# Altium PCB ePBR22_ACC_Charging.PcbDoc (part 1 of 3)
Units mil, origin at the board's own origin, x right, y up, seen from the top; angles counter-clockwise.
Board outline 10580 x 3865 mil, 2 copper layers (Top Layer, Bottom Layer); 147 components, 103 nets, 520 pads, 142 vias.
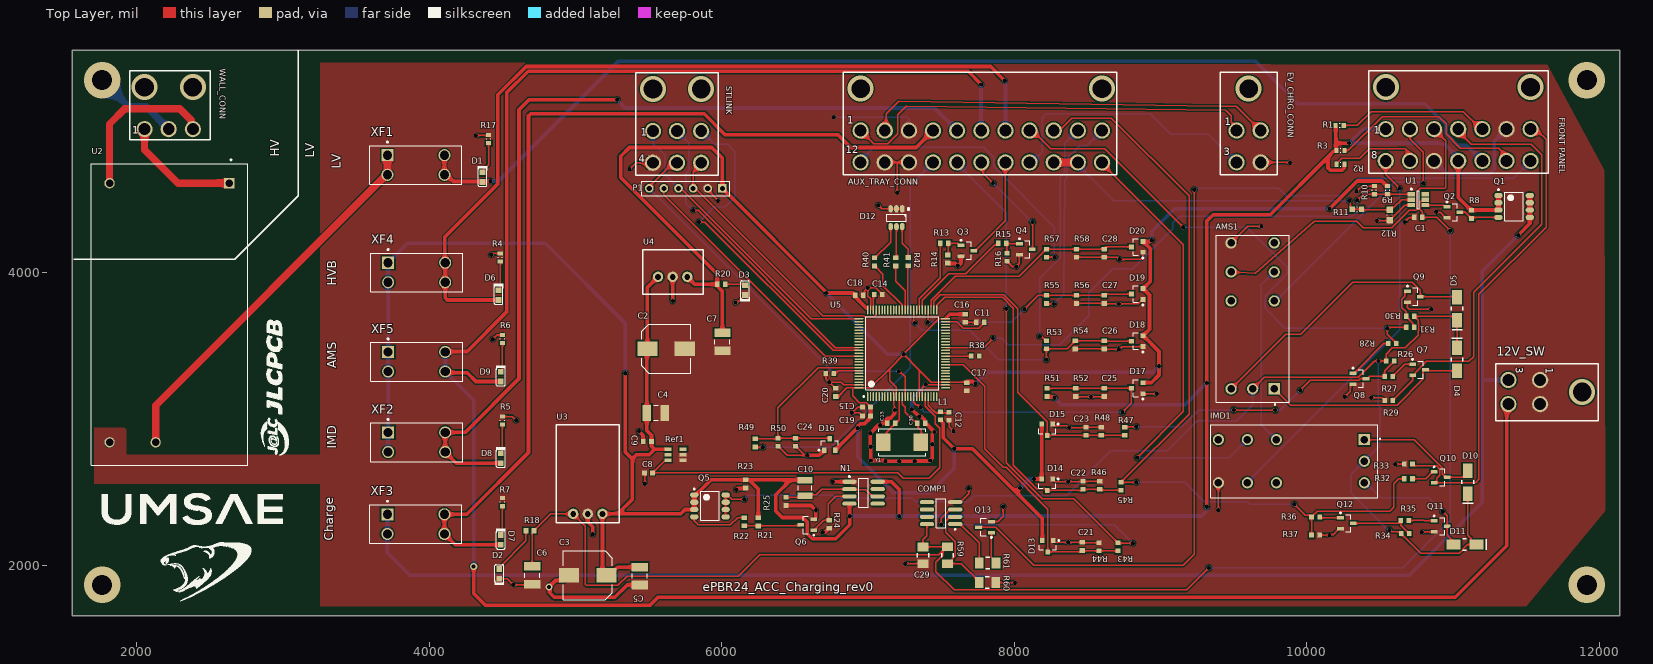
[diagram p0: Top Layer view]
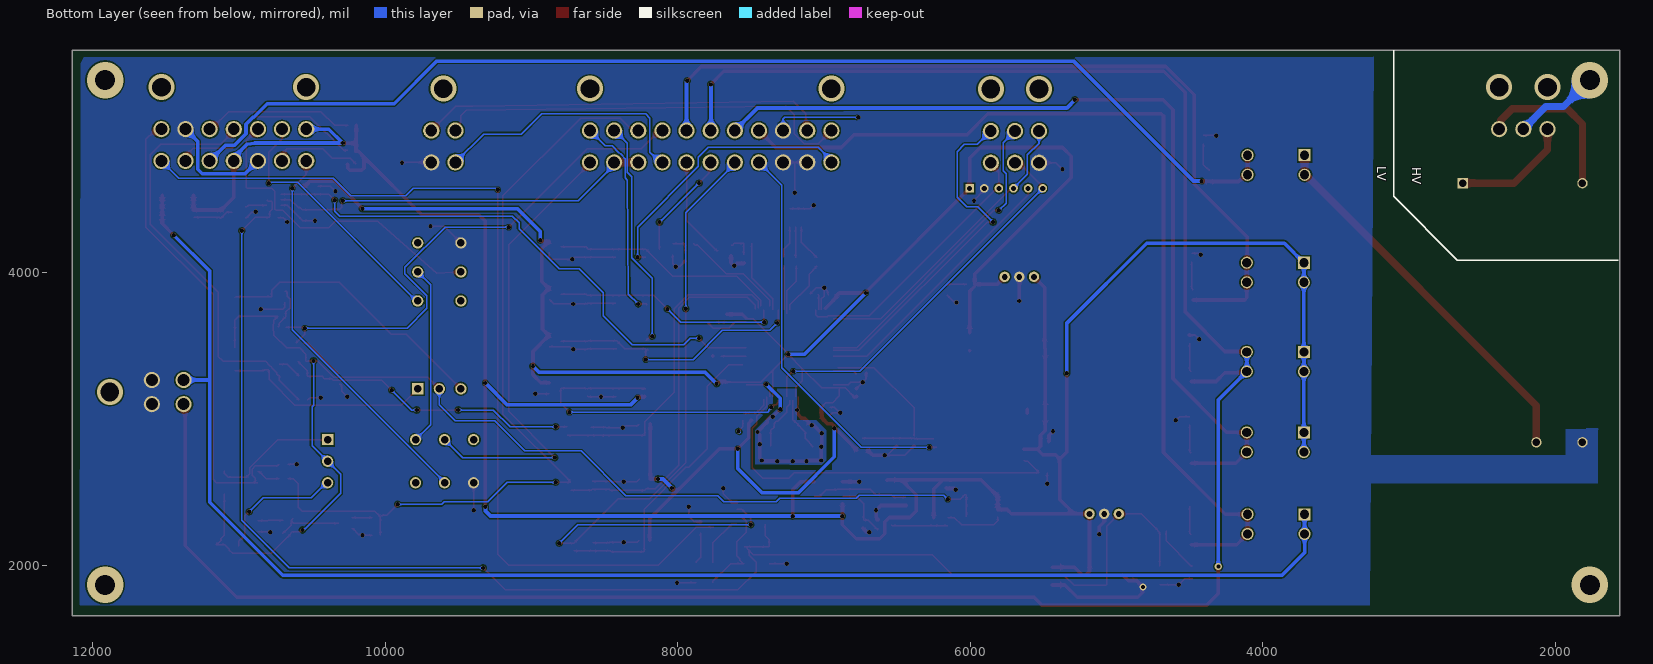
[diagram p1: Bottom Layer view, seen from below]

## Layer stack, top to bottom
Top Solder: solder mask 0.4, Solder Resist, Dk 3.5
Top Layer: signal copper 1.4
Dielectric 1: dielectric 12.6, FR-4, Dk 4.8
Bottom Layer: signal copper 1.4
Bottom Solder: solder mask 0.4, Solder Resist, Dk 3.5

## Board outline
1560,1655 12140,1655 12140,5520 1560,5520

## Design rules (kind name [scope] priority, off if disabled: settings)
Clearance "Schematic Clearance Constraint" [InComponent('U5')] p1: gap=10 ignorepadtopadclearanceinfootprint=FALSE except(0: Arc-Hole Track-Hole SMDPad-Hole THPad-Hole Via-Hole Fill-Hole Poly-Hole Region-Hole Text-Hole)
Clearance [All] p2: gap=9.45 ignorepadtopadclearanceinfootprint=TRUE except(3.5: Arc-Arc Arc-Track Track-Track; 5: SMDPad-SMDPad; 7.87: Arc-SMDPad Track-SMDPad Fill-Fill Fill-Poly Fill-Region Poly-Poly Poly-Region Region-Region; 9.61: SMDPad-Via; 9.84: Arc-Hole Track-Hole; 10: Arc-Via Track-Via Via-Via; 12.99: Arc-THPad Track-THPad; 19.68: THPad-THPad)
DiffPairsRouting [All] p1: maxlimit=10 minlimit=3.5 mostfreqgap=10 toplayer_minwidth=3.5 toplayer_maxwidth=15 toplayer_prefwidth=15 bottomlayer_minwidth=3.5 bottomlayer_maxwidth=15 bottomlayer_prefwidth=15 maxuncoupledlength=500
Height [All] p1: minheight=0 maxheight=5000 prefheight=500
HoleSize [All] p1: absolutevalues=TRUE maxlimit=248.03 minlimit=5.91 maxpercent=80.000 minpercent=20.000
HoleToHoleClearance [All] p1: gap=196.85 allowstackedmicrovias=TRUE
MinimumSolderMaskSliver [InPadClass('All Pads') And OnLayer('Top Layer') vs OnLayer('Bottom Layer')] p1: minsoldermaskwidth=3.15
PlaneConnect [All] p1: planeconnectstyle=Direct reliefexpansion=20 reliefentries=4 reliefconductorwidth=10 reliefairgap=10
PolygonConnect [All] p1: connectstyle=Direct reliefconductorwidth=10 reliefentries=4 polygonreliefangle="90 Angle" airgapwidth=10
RoutingVias [All] p1: holewidth=7.87 width=11.81 viastyle="Through Hole" minholewidth=5.91 minwidth=9.84 maxholewidth=28 maxwidth=100
SilkToSilkClearance [All] p1: silktosilkclearance=5.91
SilkToSolderMaskClearance [IsPad] p1: minsilkscreentomaskgap=5.91 clearancetoexposedcopper=TRUE
SolderMaskExpansion [All] p1: expansion=4.02 istentingtop=FALSE
Width "Schematic Width Constraint" [InComponent('U5')] p1: maxlimit=10 minlimit=5 preferedwidth=10 minimp=50.000000 maximp=50.000000 favimp=50.000000
Width [All] p2: maxlimit=50 minlimit=3.5 preferedwidth=10
22 further rules are at their usual default settings.

## Classes and differential pairs
component class "12-Charging LED Indicator": C29 COMP1 Q13 R59 R60 R61
component class "10-Protections 2 of 2": C25 C26 C27 C28 D17 D18 D19 D20 R51 R52 R53 R54 R55 R56 R57 R58
component class "9-Protections 1 of 2": C21 C22 C23 C24 D13 D14 D15 D16 R43 R44 R45 R46 R47 R48 R49 R50
component class 8-Controller: C11 C12 C13 C14 C15 C16 C17 C18 C19 C20 C30 D12 L1 P1 R38 R39 R40 R41 R42 U5 Y1
component class "7-Latching IMD": D10 D11 IMD1 Q10 Q11 Q12 R32 R33 R34 R35 R36 R37
component class "6-Latching AMS": AMS1 D4 D5 Q7 Q8 Q9 R26 R27 R28 R29 R30 R31
component class "5-Latching Delay": C10 N1 Q5 Q6 R21 R22 R23 R24 R25
component class 4-Power: C2 C3 C4 C5 C6 C7 C8 C9 D2 D3 R18 R20 Ref1 U2 U3 U4
component class 3-Fuses: D1 D6 D7 D8 D9 R4 R5 R6 R7 R17 XF1 XF2 XF3 XF4 XF5
component class "2-FET Control": C1 Q1 Q2 Q3 Q4 R8 R9 R10 R11 R12 R13 R14 R15 R16 U1
component class 1-Connectors: 12V_SW AUX_TRAY_CONN EV_CHRG_CONN "FRONT PANEL" R1 R2 R3 STLINK WALL_CONN

## Components (designator, comment, footprint, x,y, rotation, side; value= is the part's Value field where it differs from the comment)
12V_SW "Header 4" WM1352-ND 11378,3182.5 r90 top
AMS1 "5-1393243-4" TE_5-1393243-4 9630,3683.11 r90 top
AUX_TRAY_CONN "" WM1361-ND 11013.21,5688.36 r180 top
C1 "100nF" 1608[0603] 10762.24,4377.4 r180 top value=0.1uF
C2 "UUD1H101MNL1GS" NIC-CAPA2-8X10_V 5620,3479.99 r0 top
C3 "UUD1H101MNL1GS" NIC-CAPA2-8X10_V 5085,1929.99 r180 top
C4 "Cap" C1210_M 5550,3040 r180 top value=10uF
C5 "Cap" C1210_M 5440,1925 r90 top value=10uF
C6 "Cap" C1210_M 4705,1929.99 r90 top value=10uF
C7 "Cap" C1210_M 6005,3526.01 r90 top value=10uF
C8 "Cap" 1608[0603] 5500,2630 r0 top value=1uF
C9 "Cap" 1608[0603] 5492.56,2845 r0 top value=100nF
C10 "100u" C1210 6570,2526.85 r270 top
C11 "Cap" 1608[0603] 7767.44,3659.65 r0 top
C12 "Cap" 1608[0603] 7555,3017.56 r90 top value=100nF
C13 "Cap" 1608[0603] 7160,2970 r180 top
C14 "Cap" 1608[0603] 7070,3849.65 r180 top
C15 "Cap" 1608[0603] 6990,3080 r0 top value=10nF
C16 "Cap" 1608[0603] 7665,3687.2 r90 top value=10nF
C17 "Cap" 1608[0603] 7675,3220 r90 top value=10nF
C18 "Cap" 1608[0603] 6940,3844.65 r180 top value=10nF
C19 "Cap" 1608[0603] 6990,3020 r0 top value=10nF
C20 "Cap" 1608[0603] 6780,3180 r270 top value=10nF
C21 "Cap" 1608[0603] 8465,2127.2 r270 top value=0.47uF
C22 "Cap" 1608[0603] 8470,2544.65 r270 top value=100nF
C23 "Cap" 1608[0603] 8490,2914.65 r270 top value=100nF
C24 "Cap" 1608[0603] 6505,2839.65 r90 top value=0.47uF
C25 "Cap" 1608[0603] 8615,3180 r90 top value=100nF
C26 "Cap" 1608[0603] 8615.42,3504.65 r90 top value=100nF
C27 "Cap" 1608[0603] 8615.42,3815.64 r90 top value=100nF
C28 "Cap" 1608[0603] 8615.42,4132.31 r90 top value=100nF
C29 "0.1uF" "1206 (3216 Metric)" 7375,2068.7 r90 top
C30 "Cap" 1608[0603] 7365,2970 r180 top
COMP1 "LPV7215MFX/NOPB" SOIC-SN8_M 7500,2355 r180 top
D1 "KP-1608MGC" KING-0603LED_GREEN_V 4365,4651.53 r270 top
D2 "KP-1608MGC" KING-0603LED_GREEN_V 4480,1940 r90 top
D3 "KP-1608MGC" KING-0603LED_GREEN_V 6160,3880 r90 top
D4 "D Zener" DO214AC 11027.44,3406.81 r90 top
D5 "D Zener" DO214AC 11027.44,3751.81 r270 top
D6 "KP-1608MGC" KING-0603LED_GREEN_V 4475,3845.47 r270 top
D7 "KP-1608MGC" KING-0603LED_GREEN_V 4490,2172.62 r270 top
D8 "KP-1608MGC" KING-0603LED_GREEN_V 4490,2730.23 r270 top
D9 "KP-1608MGC" KING-0603LED_GREEN_V 4490,3287.85 r270 top
D10 "D Zener" DO214AC 11100,2565.87 r270 top
D11 "D Zener" DO214AC 11081.26,2139.99 r0 top
D12 "" CLX6C-FKB 7195,4374.65 r270 top
D13 "SZNUP1301ML3T1G" ONSC-SOT-23-3-318-08_V 8230,2129.65 r270 top
D14 "SZNUP1301ML3T1G" ONSC-SOT-23-3-318-08_V 8225,2549.65 r270 top
D15 "SZNUP1301ML3T1G" ONSC-SOT-23-3-318-08_V 8225,2924.65 r270 top
D16 "SZNUP1301ML3T1G" ONSC-SOT-23-3-318-08_V 6740,2824.65 r90 top
D17 "SZNUP1301ML3T1G" ONSC-SOT-23-3-318-08_V 8840,3209.65 r180 top
D18 "SZNUP1301ML3T1G" ONSC-SOT-23-3-318-08_V 8840,3531.31 r180 top
D19 "SZNUP1301ML3T1G" ONSC-SOT-23-3-318-08_V 8840,3852.98 r180 top
D20 "SZNUP1301ML3T1G" ONSC-SOT-23-3-318-08_V 8840,4174.65 r180 top
EV_CHRG_CONN "Header 4" WM1352-ND 9602.5,4753 r180 top
"FRONT PANEL" "" WM1357-ND 11523.35,5946.16 r180 top
IMD1 "5-1393243-4" TE_5-1393243-4 9915,2710 r180 top
L1 "Ferrite Bead" 1608[0603] 7495,3020 r270 top
N1 "555 Timer" SO8_M 6970,2494.65 r0 top
P1 "Header 6" HDR1X6 6005,4575 r180 top
Q1 "PFET - FDS6675BZ" SOIC127P600X175-8N 11417.24,4451.77 r0 top
Q2 "" SOT-23_N 11002.24,4412.4 r0 top
Q3 "" SOT-23_N 7680,4149.65 r0 top
Q4 "" SOT-23_N 8080,4159.65 r0 top
Q5 "PFET - FDS6675BZ" SOIC127P600X175-8N 5920,2404.65 r0 top
Q6 "" SOT-23_N 6585,2274.65 r180 top
Q7 "" SOT-23_N 10767.44,3335.55 r0 top
Q8 "" SOT-23_N 10360,3275 r0 top
Q9 "" SOT-23_N 10732.44,3835.55 r0 top
Q10 "" SOT-23_N 10915,2600.87 r0 top
Q11 "" SOT-23_N 10915,2265.87 r0 top
Q12 "" SOT-23_N 10274.29,2285.87 r0 top
Q13 "" SOT-23_N 7800,2259.65 r180 top
R1 "560" RESC0603(1608)_L 10225,5005 r180 top
R2 "560" RESC0603(1608)_L 10230,4740 r0 top
R3 "560" RESC0603(1608)_L 10230,4835 r0 top
R4 "560" RESC0603(1608)_L 4486.78,4102.56 r90 top
R5 "560" RESC0603(1608)_L 4501.78,2987.32 r90 top
R6 "560" RESC0603(1608)_L 4501.78,3544.94 r90 top
R7 "560" RESC0603(1608)_L 4501.78,2429.71 r90 top
R8 "Res1" 1608[0603] 11126.08,4396.72 r90 top value=10K
R9 "10K" RESC0603(1608)_L 10552.24,4562.4 r90 top
R10 "10K" RESC0603(1608)_L 10462.24,4562.4 r270 top
R11 "24K" RESC0603(1608)_N 10342.24,4432.4 r180 top value="24000.00 Ohm"
R12 "9K1" RESC0603(1608)_M 10567.24,4392.4 r90 top value="9100.00 Ohm"
R13 "120" 1608[0603] 7522.44,4199.65 r0 top
R14 "10K" 1608[0603] 7545,4092.2 r90 top
R15 "120" 1608[0603] 7917.44,4199.65 r0 top
R16 "10K" 1608[0603] 7950,4104.65 r90 top
R17 "560" RESC0603(1608)_L 4406.78,4912.09 r90 top
R18 "Res1" 1608[0603] 4690,2234.99 r180 top value=180R
R20 "Res1" 1608[0603] 5997.44,3919.99 r0 top value=82R
R21 "Res1" 1608[0603] 6250,2295 r90 top value=10K
R22 "Res1" 1608[0603] 6155,2297.09 r90 top value=100
R23 "Res1" 1608[0603] 6165,2554.65 r90 top value=10K
R24 "Res1" 1608[0603] 6735,2280 r90 top value=10K
R25 "Res1" 1608[0603] 6440,2435 r90 top value=100K
R26 "RHM1.0KDCT-ND" 1608[0603] 10570,3395 r0 top
R27 "Res1" 1608[0603] 10560,3290 r0 top value=1k
R28 "Res1" 1608[0603] 10585,3515 r180 top value=1k
R29 "Res1" 1608[0603] 10560,3125 r0 top value=10K
R30 "RHM1.0KDCT-ND" 1608[0603] 10707.44,3700.55 r180 top
R31 "1k" 1608[0603] 10707.44,3625.55 r0 top value=120
R32 "Res1" 1608[0603] 10695,2590 r0 top value=1k
R33 "Res1" 1608[0603] 10695,2690 r0 top value=10k
R34 "RHM1.0KDCT-ND" 1608[0603] 10672.56,2215 r0 top
R35 "Res1" 1608[0603] 10670,2305 r180 top value=1k
R36 "Res1" 1608[0603] 10060,2328.27 r180 top value=1k
R37 "Res1" 1608[0603] 10060,2205 r0 top value=10k
R38 "Res1" 1608[0603] 7732.56,3429.65 r0 top value=10k
R39 "Res1" 1608[0603] 6740,3310 r180 top value=10k
R40 "Res1" 1608[0603] 7045,4072.2 r90 top value=130
R41 "Res1" 1608[0603] 7190,4072.2 r90 top value=36
R42 "Res1" 1608[0603] 7275,4075 r90 top value=36
R43 "Res1" 1608[0603] 8710,2124.65 r90 top value=1.8k
R44 "Res1" 1608[0603] 8580,2124.65 r270 top value=3.3k
R45 "Res1" 1608[0603] 8730,2539.65 r270 top value=5k1
R46 "Res1" 1608[0603] 8585,2544.65 r270 top value=1k5
R47 "Res1" 1608[0603] 8755,2914.65 r270 top value=5k1
R48 "Res1" 1608[0603] 8595,2914.65 r270 top value=1k5
R49 "Res1" 1608[0603] 6230,2835 r270 top value=1.8k
R50 "Res1" 1608[0603] 6385,2839.65 r90 top value=3.3k
R51 "Res1" 1608[0603] 8225,3180 r90 top value=5k1
R52 "Res1" 1608[0603] 8420,3180 r90 top value=1k5
R53 "Res1" 1608[0603] 8220,3505 r270 top value=5k1
R54 "Res1" 1608[0603] 8417.71,3504.65 r90 top value=1k5
R55 "Res1" 1608[0603] 8220,3815.64 r90 top value=5k1
R56 "Res1" 1608[0603] 8425,3815.64 r90 top value=1k5
R57 "Res1" 1608[0603] 8220,4132.31 r90 top value=5k1
R58 "Res1" 1608[0603] 8425,4132.31 r90 top value=1k5
R59 "10K" "1206 (3216 Metric)" 7545,2065 r270 top
R60 "10.7K" "1206 (3216 Metric)" 7815,1880 r180 top
R61 "100" "1206 (3216 Metric)" 7820,2014.65 r0 top
Ref1 "LT6654AHS6-3.3" TSOT-23 5685,2755 r90 top
STLINK "Header 6" WM1353-ND 5942.5,4750 r180 top
U1 "2-input NAND Gate" SOT23-6_M 10762.24,4497.4 r0 top
U2 "IRM-20-12" MEANW-IRM-20-12 2225,3725 r90 top
U3 "Volt Reg" DCDC_HORIZONTAL 5085,2349.99 r0 top
U4 "Volt Reg" DCDC_VERTICAL 5665,3969.99 r180 top
U5 "STM32F446RELQFP100" STM-LQFP100_L 7234.21,3447.76 r90 top
WALL_CONN "Header 3" WM18446-ND 2467.5,4763 r180 top
XF1 "5A Fuse 36-3568-ND" KSTN-3568_V 3910,4735 r0 top
XF2 "2A Fuse 36-3568-ND" KSTN-3568_V 3915,2840 r0 top
XF3 "1A Fuse 36-3568-ND" KSTN-3568_V 3910,2280 r0 top
XF4 "1A Fuse 36-3568-ND" KSTN-3568_V 3915,4000 r0 top
XF5 "1A Fuse 36-3568-ND" KSTN-3568_V 3915,3390 r0 top
Y1 "ABM2-8.000MHZ-D4Y-T" ABM2-8.000MHZ-D4Y-T 7255,2840 r0 top

## Footprints (in the part's own frame and the unit in brackets; to place one, negate y for a bottom-side part, rotate by r counter-clockwise, add the part's x,y. Pads: shape width x height; smd on the part's side, far side on the other; paste and mask are expansions set on the pad)
"1206 (3216 Metric)" [mm]
  rect 1.5x1.9 smd: 1(-1.5,0) 2(1.4,0)
  silkscreen extent -0.4,-1 0.3,1, body extent -1.4,-0.89 1.4,0.89, height 1.3
1608[0603] [mm] "Chip Capacitor, Body 1.6x0.8mm, IPC High Density"
  rect 0.8x0.9 smd: 1(-0.7,0) 2(0.7,0)
  body extent -0.87,-0.48 0.87,0.48, height 1.3
ABM2-8.000MHZ-D4Y-T [mm] "CRYSTAL 8.0000MHZ 18PF SMD"
  rect 2.5x3 smd paste+0 mask+0: 1(2.715,-0.028) 2(-3.785,-0.028)
  silkscreen extent -4.61,-2.35 3.54,2.3, body extent -5.13,-2.45 4.07,2.4, height 0.25
C1210 [mm] "Chip Capacitor, Body 3.2x2.5mm, IPC High Density"
  rect 1.1x2.6 smd: 1(-1.35,0) 2(1.35,0)
  silkscreen extent -0.4,-1.2 0.4,1.2, body extent -1.7,-1.35 1.7,1.35, height 1.3
C1210_M [mm] "Chip Capacitor, Body 3.2x2.5mm, IPC Low Density"
  rect 1.5x2.8 smd: 1(-1.55,0) 2(1.55,0)
  silkscreen extent -0.4,-1.3 0.4,1.3, body extent -1.7,-1.35 1.7,1.35, height 1.5
CLX6C-FKB [mm]
  oval 1.25x0.8 smd: 1(-1.55,1) 2(-1.55,0) 3(-1.55,-1) 4(1.55,-1) 5(1.55,0) 6(1.55,1)
  silkscreen extent -1.72,-1.7 0.6,2.32, body extent -1.7,-1.7 1.7,1.7, height 2.8
DCDC_HORIZONTAL [mm]
  round 1.8 hole 1: 1(2.54,0) 2(0,0) 3(-2.54,0)
  silkscreen extent -5.45,-1.5 5.45,15.5, body extent -5.23,-1.29 5.18,15.22, height 7.75
DCDC_VERTICAL [mm]
  round 1.8 hole 1: 1(2.54,0) 2(0,0) 3(-2.54,0)
  silkscreen extent -5.33,-4.75 5.2,2.98, body extent -5.28,-4.87 5.14,2.87, height 17.18
DO214AC [mm]
  rect 2.5x1.7 smd: 1(-2,0) 2(2,0)
  silkscreen extent -0.38,-1.02 3.67,1.02, body extent -2.42,-1.1 2.4,1.1, height 2.5
HDR1X6 [mm] "Connector; Header; 6 Position"
  rect 1.5x1.5 hole 0.9: 1(0,0)
  round 1.5 hole 0.9: 2(2.54,0) 3(5.08,0) 4(7.62,0) 5(10.16,0) 6(12.7,0)
  silkscreen extent -1.27,-1.27 13.97,1.27
KING-0603LED_GREEN_V [mm] "SMT LED, 2-Leads, Body 1.6x0.8mm (0603-Size)"
  rect 1x1 smd paste+0 mask+0: 1(0.85,0) 2(-0.85,0)
  silkscreen extent -1.97,-0.85 1.6,0.85, body extent -0.92,-0.53 1.09,0.53, height 1.1
KSTN-3568_V [mm] "THD, 4-Leads, Body 16x6.73mm, Pitch 9.9mm"
  rect 2.1x2.1 hole 1.6: 1(-4.95,1.7)
  round 2.1 hole 1.6: 2(-4.95,-1.7) 3(4.95,1.7) 4(4.95,-1.7)
  silkscreen extent -8,-3.36 8,4.09, body extent -8,-3.37 8,3.37, height 7.44
MEANW-IRM-20-12 [mm] "THD, 4-Leads, Body 52.4x27.2mm, Height 24mm"
  rect 1.8x1.8 hole 1.3: 1(22.5,-10.4)
  round 1.8 hole 1.3: 2(22.5,10.4) 3(-22.5,10.4) 4(-22.5,2.4)
  silkscreen extent -26.5,-13.6 26.67,13.6, body extent -26.5,-13.6 25.9,13.6, height 24
NIC-CAPA2-8X10_V [mm] "Aluminum Electrolytic Capacitor, Diameter 8mm, Height 10.8mm, Pitch 6.5mm"
  rect 3.5x2.5 smd: 1(-3.25,0) 2(3.25,0)
  silkscreen extent -4.25,-4.25 4.25,4.25, body extent -3.99,-3.97 3.99,4, height 10.8
ONSC-SOT-23-3-318-08_V [mm] "SOT23, 3-Leads, Body 2.92x1.3mm, Pitch 0.95mm"
  rect 0.9x0.8 smd: 1(-1,0.95) 2(-1,-0.95) 3(1,0)
  silkscreen extent -1.12,-1.46 0.65,2.03, body extent -0.65,-1.46 0.65,1.46, height 1.11
RESC0603(1608)_L [mm]
  rect 0.7x0.9 smd: 1(-0.7,0) 2(0.7,0)
  silkscreen extent -0.05,-0.35 0.05,0.35, body extent -0.85,-0.47 0.85,0.47, height 0.6
RESC0603(1608)_M [mm] "Chip Resistor, Body 1.6x0.8mm, IPC Low Density"
  rect 1.1x1.1 smd: 1(-0.9,0) 2(0.9,0)
  silkscreen extent -0.05,-0.45 0.05,0.45, body extent -0.85,-0.47 0.85,0.47, height 0.6
RESC0603(1608)_N [mm] "Chip Resistor, Body 1.6x0.8mm, IPC Medium Density"
  rect 0.9x1 smd: 1(-0.8,0) 2(0.8,0)
  silkscreen extent -0.05,-0.4 0.05,0.4, body extent -0.85,-0.47 0.85,0.47, height 0.6
SO8_M [mm] "SOIC, 8-Leads, Body 4.9x3.9mm, Pitch 1.27mm, IPC Low Density"
  oval 2.5x0.7 smd: 1(-2.45,1.905) 2(-2.45,0.635) 3(-2.45,-0.635) 4(-2.45,-1.905) 5(2.45,-1.905) 6(2.45,-0.635) 7(2.45,0.635) 8(2.45,1.905)
  silkscreen extent -2.57,-2.5 0.8,2.93, body extent -2,-2.5 2,2.5, height 1.75
SOIC127P600X175-8N [mm] "SOIC, 8-Leads, Body 4.90x3.90mm, Pitch 1.27mm, IPC Medium Density"
  oval 1.45x0.9 smd: 1(-2.725,1.905) 2(-2.725,0.635) 3(-2.725,-0.635) 4(-2.725,-1.905) 5(2.725,-1.905) 6(2.725,-0.635) 7(2.725,0.635) 8(2.725,1.905)
  silkscreen extent -2.85,-2.5 1.6,3.03, body extent -2,-2.5 2,2.5, height 1.75
SOIC-SN8_M [mm] "SOIC, 8-Leads, Body 4.9x3.9mm, Pitch 1.27mm, IPC Low Density"
  oval 2.5x0.7 smd: 1(-2.45,1.905) 2(-2.45,0.635) 3(-2.45,-0.635) 4(-2.45,-1.905) 5(2.45,-1.905) 6(2.45,-0.635) 7(2.45,0.635) 8(2.45,1.905)
  silkscreen extent -2.58,-2.5 0.8,2.93, body extent -2,-2.5 2,2.5, height 1.75
SOT23-6_M [mm] "SOT23, 6-Leads, Body 2.9x1.6mm, Pitch 0.95mm, Lead Span 2.7mm, IPC Low Density"
  rect 1.3x0.7 smd: 1(-1.2,0.95) 2(-1.2,0) 3(-1.2,-0.95) 4(1.2,-0.95) 5(1.2,0) 6(1.2,0.95)
  silkscreen extent -1.32,-1.55 0.15,1.97, body extent -0.9,-1.55 0.9,1.55, height 1.45
SOT-23_N [mm] "SOT23, 3-Leads, Body 2.9x1.3mm, Pitch 0.95mm, Lead Span 2.5mm, IPC Medium Density"
  rect 1.15x0.6 smd: 1(-1.125,0.95) 2(-1.125,-0.95) 3(1.125,0)
  silkscreen extent -1.25,-1.5 0.7,1.92, body extent -0.7,-1.5 0.7,1.5, height 1.1
STM-LQFP100_L [mm] "Thin QFP, 100-Leads, Body 14x14mm, Pitch 0.5mm, IPC High Density"
  oval 1.55x0.25 smd: 1(-7.525,6) 2(-7.525,5.5) 3(-7.525,5) 4(-7.525,4.5) 5(-7.525,4) 6(-7.525,3.5) 7(-7.525,3) 8(-7.525,2.5) 9(-7.525,2) 10(-7.525,1.5) 11(-7.525,1) 12(-7.525,0.5) 13(-7.525,0) 14(-7.525,-0.5) 15(-7.525,-1) 16(-7.525,-1.5) 17(-7.525,-2) 18(-7.525,-2.5) 19(-7.525,-3) 20(-7.525,-3.5) 21(-7.525,-4) 22(-7.525,-4.5) 23(-7.525,-5) 24(-7.525,-5.5) 25(-7.525,-6) 51(7.525,-6) 52(7.525,-5.5) 53(7.525,-5) 54(7.525,-4.5) 55(7.525,-4) 56(7.525,-3.5) 57(7.525,-3) 58(7.525,-2.5) 59(7.525,-2) 60(7.525,-1.5) 61(7.525,-1) 62(7.525,-0.5) 63(7.525,0) 64(7.525,0.5) 65(7.525,1) 66(7.525,1.5) 67(7.525,2) 68(7.525,2.5) 69(7.525,3) 70(7.525,3.5) 71(7.525,4) 72(7.525,4.5) 73(7.525,5) 74(7.525,5.5) 75(7.525,6)
  oval 0.25x1.55 smd: 26(-6,-7.525) 27(-5.5,-7.525) 28(-5,-7.525) 29(-4.5,-7.525) 30(-4,-7.525) 31(-3.5,-7.525) 32(-3,-7.525) 33(-2.5,-7.525) 34(-2,-7.525) 35(-1.5,-7.525) 36(-1,-7.525) 37(-0.5,-7.525) 38(0,-7.525) 39(0.5,-7.525) 40(1,-7.525) 41(1.5,-7.525) 42(2,-7.525) 43(2.5,-7.525) 44(3,-7.525) 45(3.5,-7.525) 46(4,-7.525) 47(4.5,-7.525) 48(5,-7.525) 49(5.5,-7.525) 50(6,-7.525) 76(6,7.525) 77(5.5,7.525) 78(5,7.525) 79(4.5,7.525) 80(4,7.525) 81(3.5,7.525) 82(3,7.525) 83(2.5,7.525) 84(2,7.525) 85(1.5,7.525) 86(1,7.525) 87(0.5,7.525) 88(0,7.525) 89(-0.5,7.525) 90(-1,7.525) 91(-1.5,7.525) 92(-2,7.525) 93(-2.5,7.525) 94(-3,7.525) 95(-3.5,7.525) 96(-4,7.525) 97(-4.5,7.525) 98(-5,7.525) 99(-5.5,7.525) 100(-6,7.525)
  silkscreen extent -7.65,-6.35 6.35,6.8, body extent -7,-7 7,7, height 1.6
TE_5-1393243-4 [mm]
  round 1.95 hole 1.3: 11(8.15,-3.75) 12(3.11,-3.75) 14(13.19,-3.75) 21(8.15,3.75) 22(3.11,3.75) 24(13.19,3.75) A2(-12.15,3.75) A3(-12.15,0)
  rect 1.95x1.95 hole 1.3: A1(-12.15,-3.75)
  silkscreen extent -14.96,-6.35 14.5,6.35, body extent -14.5,-6.33 14.47,6.33, height 15.7
TSOT-23 [mm]
  rect 0.62x1.22 smd: 1(-0.95,-1.31) 2(0,-1.31) 3(0.95,-1.31) 4(0.95,1.31) 5(0,1.31) 6(-0.95,1.31)
  body extent -1.45,-0.85 1.45,0.85, height 1
WM1352-ND [mil]
  round 111 hole 81: 1(82.5,-217) 2(-82.5,-217) 3(82.5,0) 4(-82.5,0)
  silkscreen extent -195,-615 195,85, body extent -184,-767 209,17, height 449
WM1353-ND [mil]
  round 111 hole 81: 1(412.5,-217) 2(247.5,-217) 3(82.5,-217) 4(412.5,0) 5(247.5,0) 6(82.5,0)
  silkscreen extent -35,-615 530,85, body extent -14,-767 545,17, height 449
WM1357-ND [mil] "CONN HEADER R/A 14POS 4.2MM"
  round 111 hole 81: 1(983.35,966.16) 2(818.35,966.16) 3(653.35,966.16) 4(488.35,966.16) 5(323.35,966.16) 6(158.35,966.16) 7(-6.55,966.16) 8(983.35,1183.16) 9(818.35,1183.16) 10(653.35,1183.16) 11(488.35,1183.16) 12(323.35,1183.16) 13(158.35,1183.16) 14(-6.55,1183.16)
  silkscreen extent -127,568 1101,1268, body extent -116,420 1104,1205, height 449
WM1361-ND [mil] "CONN HEADER R/A 22POS 4.2MM"
  round 111 hole 81: 1(4063.21,718.36) 2(3898.21,718.36) 3(3733.21,718.36) 4(3568.21,718.36) 5(3403.21,718.36) 6(3238.21,718.36) 7(3073.21,718.35) 8(2908.21,718.35) 9(2743.21,718.35) 10(2578.21,718.35) 11(2413.21,718.35) 12(4063.21,935.36) 13(3898.21,935.36) 14(3733.21,935.36) 15(3568.21,935.36) 16(3403.21,935.36) 17(3238.21,935.36) 18(3073.21,935.35) 19(2908.21,935.35) 20(2743.21,935.35) 21(2578.21,935.35) 22(2413.21,935.35)
  silkscreen extent 2311,320 4181,1020, body extent 2305,173 4187,958, height 449
WM18446-ND [mil]
  round 111 hole 81: 1(412.5,-217) 2(247.5,-217) 3(82.5,-217)
  silkscreen extent -35,-615 515,-145, body extent -32,-748 512,-195, height 283

## Part data
12V_SW EV_CHRG_CONN: "Header, 4-Pin", Supplier Part Number 1=WM1352-ND, LatestRevisionDate=17-Jul-2002, LatestRevisionNote="Re-released for DXP Platform.", Publisher="Altium Limited", Supplier 1=Digi-Key
AMS1 IMD1: "Electromechanical Relay 12VDC 240Ohm 15A DPDT __ 29mm 12.7mm 15.7mm__ THT Power Relay", Package=None, Supplier Part Number 1=RT424F12-ND, MF="TE Connectivity", MP=5-1393243-4, SnapEDA_Link=https://www.snapeda.com/parts/5-1393243-4/TE%20Connectivity/view-part/?ref=snap, Supplier 1=Digi-Key, TE_purchase_URL=https://www.te.com/usa-en/product-5-1393243-4.html?te_bu=Cor&te_type=disp&te_campaign=seda_glo_cor-seda-global-disp-prtnr-fy19-seda-model-bom-cta_sma-317_1&elqCampaignId=32493
AUX_TRAY_CONN: library part "Header 22", "Header, 22-Pin", Supplier Part Number 1=WM1361-ND, LatestRevisionDate=17-Jul-2002, LatestRevisionNote="Re-released for DXP Platform.", Publisher="Altium Limited", Supplier 1=Digi-Key
C1: library part 0805C-100nF-25V-X7R-MUR, "CAP CER 0.1UF 50V X7R 0603", Capacitance=0.1µF, Manufacturer=Kemet, Manufacturer Part Number=C0603C104K5RACAUTO, Operating Temperature="-55°C ~ 125°C", Package / Case="0603 (1608 Metric)", Ratings=AEC-Q200, Supplier Part Number 1=399-6856-1-ND, Temperature Coefficient=X7R, Tolerance=±10%, Voltage - Rated=50V, Applications=Automotive, Category=Capacitors, ComponentLink1Description=http://capacitoredge.kemet.com/capedge2/DataSheet?pn=C0603C104K5RACAUTO, ComponentLink1URL=http://capacitoredge.kemet.com/capedge2/DataSheet?pn=C0603C104K5RACAUTO, Features=-, Height - Seated (Max)=-, Lead Spacing=-, Lead Style=-, Mounting Type="Surface Mount, MLCC", Packaging="Cut Tape (CT)", Pricing 1="1=0.14, 10=0.095, 25=0.0672, 50=0.0514, 100=0.0435, 250=0.03556, 1000=0.02324 (CAD)", RoHS="RoHS Compliant", Size / Dimension="0.063\" L x 0.031\" W (1.60mm x 0.80mm)", Stock 1=157876, Supplier 1=Digi-Key, Thickness (Max)="0.034\" (0.87mm)"
C2 C3: library part CMP-0687-00073-1, "Aluminum Electrolytic Capacitor, UD Series, Low Impedance, 100 uF, 50 V, + / - 20%, -55 to 105 degC, Chip Type, 8 x 10 mm D x L, Pb-Free, Reel", Capacitance=100µF, ESR (Equivalent Series Resistance)=-, Lifetime @ Temp.="5000 Hrs @ 105°C", Manufacturer=Nichicon, Operating Temperature="-55°C ~ 105°C", Package / Case="Radial, Can - SMD", Rated Capacitance="100 uF", Rated Ripple Current (at 100kHz)="300 mA", Rated Voltage="50 V", Ripple Current=300mA, Supplier Part Number 1=493-2306-1-ND, Tolerance=±20%, Tolerance Rated Capacitance="-20 to 20%", Voltage Rating=50V, Applications="General Purpose", Category=Capacitors, ComponentLink1Description="Manufacturer URL", ComponentLink1URL=http://www.nichicon.co.jp/, ComponentLink2Description=Datasheet, ComponentLink2URL=http://products.nichicon.co.jp/en/pdf/XJA043/e-ud.pdf, ComponentLink3Description="Package Specification", ComponentLink3URL=http://products.nichicon.co.jp/en/pdf/XJA043/e-ud.pdf, ComponentLink4Description=http://nichicon-us.com/english/products/pdfs/e-uud.pdf, ComponentLink4URL=http://nichicon-us.com/english/products/pdfs/e-uud.pdf, DatasheetVersion=08/2012, Diameter="8 mm", Endurance Time="5000 h", Height - Seated (Max)="0.394\" (10.00mm)", Impedance="0.34 Ohm", Lead Spacing=-, Length="10 mm", Manufacturer Part Number=UUD1H101MNL1GS, Mounting Technology="Surface Mount", Mounting Type="Surface Mount", PackageDescription="2-Pin Surface Mount Device, Diameter 8 mm, Height 10 mm, Pitch 6.5 mm", PackageReference=CAPAE-D8H10, Packaging="Cut Tape (CT)", Packing="Dia382mm Reel", Part Status=Active, PartNumber=UUD1H101MNL1GS, Polarization=Polar, Pricing 1="1=0.92, 10=0.685, 25=0.5868, 50=0.5478, 100=0.4696, 250=0.43044 (CAD)", RoHS=TRUE, Size / Dimension="0.315\" Dia (8.00mm)", Stock 1=65948, Supplier 1=Digi-Key, Surface Mount Land Size="0.327\" L x 0.327\" W (8.30mm x 8.30mm)"
C4 C5 C6 C7: "Capacitor", Capacitance=10µF, Manufacturer=Yageo, Manufacturer Part Number=CC1210ZKY5V8BB106, Operating Temperature="-30°C ~ 85°C", Package / Case="1210 (3225 Metric)", Ratings=-, Supplier Part Number 1=311-2063-1-ND, Temperature Coefficient="Y5V (F)", Tolerance="-20%, +80%", Voltage - Rated=25V, Applications="General Purpose", Category=Capacitors, ComponentLink1Description=http://www.yageo.com/documents/recent/UPY-GPHC_Y5V_6.3V-to-50V_7.pdf, ComponentLink1URL=http://www.yageo.com/documents/recent/UPY-GPHC_Y5V_6.3V-to-50V_7.pdf, Failure Rate=-, Features=-, Height - Seated (Max)=-, Lead Spacing=-, Lead Style=-, Mounting Type="Surface Mount, MLCC", Packaging="Cut Tape (CT)", Part Status=Active, Pricing 1="1=0.47, 10=0.323, 25=0.258, 50=0.2154, 100=0.1829, 250=0.14528, 500=0.12912, 1000=0.11298 (CAD)", RoHS="RoHS Compliant", Size / Dimension="0.126\" L x 0.098\" W (3.20mm x 2.50mm)", Stock 1=1156, Supplier 1=Digi-Key, Thickness (Max)="0.083\" (2.10mm)"
C8: "Capacitor", Capacitance=1µF, Manufacturer="Murata Electronics North America", Manufacturer Part Number=GRM188R61E105KA12D, Operating Temperature="-55°C ~ 85°C", Package / Case="0603 (1608 Metric)", Ratings=-, Supplier Part Number 1=1276-1102-6-ND, Temperature Coefficient=X5R, Tolerance=±10%, Voltage - Rated=25V, Applications="General Purpose", Category=Capacitors, ComponentLink1Description=http://www.murata.com/~/media/webrenewal/support/library/catalog/products/capacitor/mlcc/c02e.pdf, ComponentLink1URL=http://www.murata.com/~/media/webrenewal/support/library/catalog/products/capacitor/mlcc/c02e.pdf, Features=-, Height - Seated (Max)=-, Lead Spacing=-, Lead Style=-, Mounting Type="Surface Mount, MLCC", Packaging="Cut Tape (CT)", Part Status=Active, RoHS="RoHS Compliant", Size / Dimension="0.063\" L x 0.031\" W (1.60mm x 0.80mm)", Supplier 1=Digi-Key, Thickness (Max)="0.035\" (0.90mm)"
C9 C12 C22 C23 C25 C26 C27 C28: "Capacitor", Capacitance=0.10µF, Manufacturer=Yageo, Manufacturer Part Number=CC0603KRX7R9BB104, Operating Temperature="-55°C ~ 125°C", Package / Case="0603 (1608 Metric)", Ratings=-, Supplier Part Number 1=311-1344-1-ND, Temperature Coefficient=X7R, Tolerance=±10%, Voltage - Rated=50V, Applications="General Purpose", Category=Capacitors, ComponentLink1Description=http://www.yageo.com/documents/recent/UPY-GPHC_X7R_6.3V-to-50V_16.pdf, ComponentLink1URL=http://www.yageo.com/documents/recent/UPY-GPHC_X7R_6.3V-to-50V_16.pdf, Failure Rate=-, Features=-, Height - Seated (Max)=-, Lead Spacing=-, Lead Style=-, Mounting Type="Surface Mount, MLCC", Packaging="Cut Tape (CT)", Part Status=Active, Pricing 1="1=0.15, 10=0.043, 25=0.0312, 50=0.0232, 100=0.0189, 250=0.0158, 500=0.01346, 1000=0.01059 (CAD)", RoHS="RoHS Compliant", Size / Dimension="0.063\" L x 0.031\" W (1.60mm x 0.80mm)", Stock 1=4016262, Supplier 1=Digi-Key, Thickness (Max)="0.035\" (0.90mm)"
C10: library part Cap, "CAP CER 100UF 6.3V X5R 1206", Capacitance=100µF, Manufacturer="Murata Electronics North America", Manufacturer Part Number=GRM31CR60J107ME39K, Operating Temperature="-55°C ~ 85°C", Package / Case="1206 (3216 Metric)", Ratings=-, Supplier Part Number 1=641-1015-1-ND, Temperature Coefficient=X5R, Tolerance=±20%, Voltage - Rated=6.3V, Applications="General Purpose", Category=Capacitors, ComponentLink1Description=http://www.murata.com/~/media/webrenewal/support/library/catalog/products/capacitor/mlcc/c02e.ashx, ComponentLink1URL=http://www.murata.com/~/media/webrenewal/support/library/catalog/products/capacitor/mlcc/c02e.ashx, Features=-, Height - Seated (Max)=-, Lead Spacing=-, Lead Style=-, Mounting Type="Surface Mount, MLCC", Packaging="Cut Tape (CT)", Part Status=Active, RoHS="RoHS Compliant", Size / Dimension="0.126\" L x 0.063\" W (3.20mm x 1.60mm)", Supplier 1=Digi-Key, Thickness (Max)="0.071\" (1.80mm)"
C11 C14: "Capacitor", Capacitance=2.2µF, Manufacturer="Taiyo Yuden", Manufacturer Part Number=TMK107BBJ225KAHT, Operating Temperature="-55°C ~ 85°C", Package / Case="0603 (1608 Metric)", Ratings=AEC-Q200, Supplier Part Number 1=587-4333-1-ND, Temperature Coefficient=X5R, Tolerance=±10%, Voltage - Rated=25V, Applications="General Purpose", Category=Capacitors, ComponentLink1Description=http://www.yuden.co.jp/productdata/catalog/en/mlcc_all_hq_e.pdf, ComponentLink1URL=http://www.yuden.co.jp/productdata/catalog/en/mlcc_all_hq_e.pdf, Features=-, Height - Seated (Max)=-, Lead Spacing=-, Lead Style=-, Mounting Type="Surface Mount, MLCC", Packaging="Cut Tape (CT)", Part Status=Active, Pricing 1="1=0.28, 10=0.193, 25=0.1416, 50=0.116, 100=0.0979, 250=0.07992, 500=0.06702, 1000=0.05928 (CAD)", RoHS="RoHS Compliant", Size / Dimension="0.063\" L x 0.031\" W (1.60mm x 0.80mm)", Stock 1=6587, Supplier 1=Digi-Key, Thickness (Max)="0.035\" (0.90mm)"
C13 C30: "Capacitor", Capacitance=25pF, Manufacturer="Taiyo Yuden", Manufacturer Part Number=TMK107BBJ225KAHT, Operating Temperature="-55°C ~ 85°C", Package / Case="0603 (1608 Metric)", Ratings=AEC-Q200, Supplier Part Number 1=587-4333-1-ND, Temperature Coefficient=X5R, Tolerance=±10%, Voltage - Rated=25V, Applications="General Purpose", Category=Capacitors, ComponentLink1Description=http://www.yuden.co.jp/productdata/catalog/en/mlcc_all_hq_e.pdf, ComponentLink1URL=http://www.yuden.co.jp/productdata/catalog/en/mlcc_all_hq_e.pdf, Features=-, Height - Seated (Max)=-, Lead Spacing=-, Lead Style=-, Mounting Type="Surface Mount, MLCC", Packaging="Cut Tape (CT)", Part Status=Active, Pricing 1="1=0.28, 10=0.193, 25=0.1416, 50=0.116, 100=0.0979, 250=0.07992, 500=0.06702, 1000=0.05928 (CAD)", RoHS="RoHS Compliant", Size / Dimension="0.063\" L x 0.031\" W (1.60mm x 0.80mm)", Stock 1=6587, Supplier 1=Digi-Key, Thickness (Max)="0.035\" (0.90mm)"
C15 C16 C17 C18 C19 C20: "Capacitor", Capacitance=10000pF, Manufacturer=Yageo, Manufacturer Part Number=CC0603KRX7R9BB103, Operating Temperature="-55°C ~ 125°C", Package / Case="0603 (1608 Metric)", Ratings=-, Supplier Part Number 1=311-1085-1-ND, Temperature Coefficient=X7R, Tolerance=±10%, Voltage - Rated=50V, Applications="General Purpose", Category=Capacitors, ComponentLink1Description=http://www.yageo.com/documents/recent/UPY-GPHC_X7R_6.3V-to-50V_16.pdf, ComponentLink1URL=http://www.yageo.com/documents/recent/UPY-GPHC_X7R_6.3V-to-50V_16.pdf, Failure Rate=-, Features=-, Height - Seated (Max)=-, Lead Spacing=-, Lead Style=-, Mounting Type="Surface Mount, MLCC", Packaging="Cut Tape (CT)", Part Status=Active, Pricing 1="1=0.15, 10=0.026, 25=0.0192, 50=0.0144, 100=0.0117, 250=0.0098, 500=0.00836, 1000=0.00657 (CAD)", RoHS="RoHS Compliant", Size / Dimension="0.063\" L x 0.031\" W (1.60mm x 0.80mm)", Stock 1=3577285, Supplier 1=Digi-Key, Thickness (Max)="0.035\" (0.90mm)"
C21 C24: "Capacitor", Capacitance=0.47µF, Manufacturer=Yageo, Manufacturer Part Number=CC0603KRX7R8BB474, Operating Temperature="-55°C ~ 125°C", Package / Case="0603 (1608 Metric)", Ratings=-, Supplier Part Number 1=311-1805-1-ND, Temperature Coefficient=X7R, Tolerance=±10%, Voltage - Rated=25V, Applications="General Purpose", Category=Capacitors, ComponentLink1Description=http://www.yageo.com/documents/recent/UPY-GPHC_X7R_6.3V-to-50V_16.pdf, ComponentLink1URL=http://www.yageo.com/documents/recent/UPY-GPHC_X7R_6.3V-to-50V_16.pdf, Failure Rate=-, Features=-, Height - Seated (Max)=-, Lead Spacing=-, Lead Style=-, Mounting Type="Surface Mount, MLCC", Packaging="Cut Tape (CT)", Part Status=Active, Pricing 1="1=0.22, 10=0.158, 25=0.1156, 50=0.0898, 100=0.0745, 250=0.06168, 500=0.05226, 1000=0.04324 (CAD)", RoHS="RoHS Compliant", Size / Dimension="0.063\" L x 0.031\" W (1.60mm x 0.80mm)", Stock 1=11076, Supplier 1=Digi-Key, Thickness (Max)="0.035\" (0.90mm)"
C29: library part Cap, "CGA5L4X7T2W104M160AA: CAP CER 0.1UF 450V X7T 1206", Supplier Part Number 1=445-12959-1-ND, LatestRevisionDate=17-Jul-2002, LatestRevisionNote="Re-released for DXP Platform.", PackageDescription="Radial Cap, Thru-Hole; 2 Leads; 0.3 in Pin Spacing", PackageReference=RAD-0.3, Published=8-Jun-2000, Publisher="Altium Limited", Supplier 1=Digi-Key
COMP1: library part CMP-0187-00236-3, "None", Case/Package=SOIC, Input Bias Current=1pA, Input Offset Voltage (Vos)=10mV, Max Operating Temperature=125°C, Max Supply Voltage=5.5V, Min Operating Temperature=-40°C, Min Supply Voltage=1.8V, Output Current=50mA, Package Quantity=3300, Power Supply Rejection Ratio (PSRR)=70dB, Quiescent Current=130uA, Common Mode Rejection Ratio=66dB, Hysteresis=5mV, Lead Free="Lead Free", Mount="Surface Mount", Number of Channels=2, Number of Elements=2, Number of Pins=8, Output Type=TTL, Packaging="Tape and Reel", Propagation Delay=80ns, Radiation Hardening=No, RoHS Compliant=Yes, Technology=CMOS, Type="General Purpose"
D1 D2 D3 D6 D7 D8 D9: library part CMP-0404-00001-1, "LED, SMT, 0603(1608), 1.1mm thickness, Green", Forward Current="30 mA", Manufacturer=Kingbright, Power Dissipation="75 mW", Reverse Voltage="5 V", Storage Temperature="-40 to +85 degC", Supplier Part Number 1=732-4980-1-ND, ComponentLink1Description="Manufacturer URL", ComponentLink1URL=http://www.kingbright.com/, Mounting Technology="Surface Mount", PackageDescription="2-Pin SMT LED, 1.6 x 0.8 mm Pitch", PackageReference=0603LED_GREEN, Packing Type="2000 pcs / reel", PartNumber=KP-1608MGC, Supplier 1=Digi-Key
D4 D5 D10 D11: "Zener Diode", Supplier Part Number 1=641-1015-1-ND, LatestRevisionDate=17-Jul-2002, LatestRevisionNote="Re-released for DXP Platform.", PackageDescription="Diode, Thru-Hole; 2 Leads; 0.7 in Pin Spacing", PackageReference=DIODE-0.7, Published=8-Jun-2000, Publisher="Altium Limited", Supplier 1=Digi-Key
D12: library part "LED - CLX6C-FKB-CGJKNCFBB789363 RGB", Color="Red, Green, Blue (RGB)", Current - Test="8mA Red, 8mA Green, 8mA Blue", Lens Color=White, Manufacturer="Cree Inc.", Manufacturer Part Number=CLX6C-FKB-CGJKNCFBB789363, Millicandela Rating="420mcd Red, 840mcd Green, 196mcd Blue", Package / Case="6-SMD, J-Lead", Supplier Device Package=6-PLCC, Supplier Part Number 1=475-2899-1-ND, Voltage - Forward (Vf) (Typ)="1.9V Red, 3V Green, 3V Blue", Category=Optoelectronics, ComponentLink1Description=http://www.cree.com/~/media/Files/Cree/LED-Components-and-Modules/HB/Data-Sheets/1281-CLX6C-FKB.pdf, ComponentLink1URL=http://www.cree.com/~/media/Files/Cree/LED-Components-and-Modules/HB/Data-Sheets/1281-CLX6C-FKB.pdf, Features=-, Height (Max)=2.90mm, Lens Style/Size="Square with Flat Top, 1.00mm", Lens Transparency=Diffused, Mounting Type="Surface Mount", Packaging="Cut Tape (CT)", Part Status=Active, RoHS="RoHS Compliant", Size / Dimension="3.40mm L x 3.40mm W", Supplier 1=Digi-Key, Viewing Angle=-, Wavelength - Dominant="622nm Red, 531nm Green, 470nm Blue", Wavelength - Peak=-
D13 D14 D15 D16 D17 D18 D19 D20: library part CMP-1063-00171-1, "Low Capacitance Diode Array for ESD Protection in a Single Data Line, 3-Pin SOT-23, Pb-Free, Tape and Reel", Manufacturer="On Semiconductor", C Max (pF)=0.9, ComponentLink1Description="Manufacturer URL", ComponentLink1URL=http://www.onsemi.com/, ComponentLink2Description=Datasheet, ComponentLink2URL=http://www.onsemi.cn/pub_link/Collateral/NUP1301ML3T1-D.PDF, ComponentLink3Description="Package Specification", ComponentLink3URL=http://www.onsemi.cn/pub_link/Collateral/318-08.PDF, DatasheetVersion="Rev. 6", Direction=Bidirectional, Mounting Technology="Surface Mount", Number of Lines=1, PackageDescription="3-Pin Small Outline Transistor, Body 2.92 x 1.3 mm, Pitch 0.95 mm", PackageReference=SOT-23-3-318-08, PackageVersion="Rev. AP, 11/2009", Packing="Tape and Reel", PartNumber=SZNUP1301ML3T1G, RoHS=Pb-Free, V(BR) Min (V)=70, VRWM Max (V)=70
"FRONT PANEL": library part "Header 14", "Header, 14-Pin", Supplier Part Number 1=WM1357-ND, LatestRevisionDate=17-Jul-2002, LatestRevisionNote="Re-released for DXP Platform.", Publisher="Altium Limited", Supplier 1=Digi-Key
L1: library part Inductor, "Inductor", Supplier Part Number 1=240-2369-1-ND, Code_IEC=1005, Code_JEITA=0402, LatestRevisionDate=29-May-2009, LatestRevisionNote="IPC-7351 Footprint Added.", PackageDescription="Chip Inductor", PackageReference=0402-A, Published=8-Jun-2000, Publisher="Altium Limited", Supplier 1=Digi-Key
N1: "IC OSC SGL TIMER 100KHZ 8-SOIC", Current - Supply=10mA, Frequency=100kHz, Manufacturer="Texas Instruments", Manufacturer Part Number=NE555DRG4, Operating Temperature="0°C ~ 70°C", Package / Case="8-SOIC (0.154\", 3.90mm Width)", Supplier Device Package=8-SOIC, Supplier Part Number 1=296-35912-1-ND, Voltage - Supply="4.5 V ~ 16 V", Category="Integrated Circuits (ICs)", ComponentLink1Description=http://www.ti.com/lit/ds/symlink/ne555.pdf, ComponentLink1URL=http://www.ti.com/lit/ds/symlink/ne555.pdf, Count=-, Mounting Type="Surface Mount", Packaging="Cut Tape (CT)", Part Status=Active, Pricing 1="1=0.71, 10=0.532, 100=0.3314, 500=0.22672, 1000=0.17441 (CAD)", RoHS="RoHS Compliant", Stock 1=6208, Supplier 1=Digi-Key, Type="555 Type, Timer/Oscillator (Single)"
P1: "Header, 6-Pin", LatestRevisionDate=17-Jul-2002, LatestRevisionNote="Re-released for DXP Platform.", Publisher="Altium Limited"
Q1 Q5: library part MOSFET, "MOSFET P-CH 8-SOIC", Current - Continuous Drain (Id) @ 25°C="11A (Ta)", Drain to Source Voltage (Vdss)=30V, Drive Voltage (Max Rds On,  Min Rds On)="4.5V, 10V", Input Capacitance (Ciss) (Max) @ Vds="2470pF @ 15V", Manufacturer="Fairchild/ON Semiconductor", Manufacturer Part Number=FDS6675BZ, Operating Temperature="-55°C ~ 150°C (TJ)", Package / Case="8-SOIC (0.154\", 3.90mm Width)", Power Dissipation (Max)="2.5W (Ta)", Supplier Device Package=8-SO, Supplier Part Number 1=FDS6675BZCT-ND, Category="Discrete Semiconductor Products", ComponentLink1Description=https://www.fairchildsemi.com/datasheets/FD/FDS6675BZ.pdf, ComponentLink1URL=https://www.fairchildsemi.com/datasheets/FD/FDS6675BZ.pdf, FET Feature=-, FET Type=P-Channel, Gate Charge (Qg) (Max) @ Vgs="62nC @ 10V", Mounting Type="Surface Mount", Packaging="Cut Tape (CT)", Part Status=Active, Pricing 1="1=1.29, 10=1.156, 100=0.9013, 500=0.74452, 1000=0.58778 (CAD)", Rds On (Max) @ Id, Vgs="13 mOhm @ 11A, 10V", RoHS="RoHS Compliant", Stock 1=7940, Supplier 1=Digi-Key, Technology="MOSFET (Metal Oxide)", Vgs (Max)=±25V, Vgs(th) (Max) @ Id="3V @ 250µA"
Q2 Q6: library part MOSFET-N, "N-Channel MOSFET", Current - Continuous Drain (Id) @ 25°C="50A (Tc)", Drain to Source Voltage (Vdss)=30V, Input Capacitance (Ciss) @ Vds="1900pF @ 15V", Manufacturer="Infineon Technologies", Manufacturer Part Number="IPD075N03L G", Package / Case="TO-252-3, DPak (2 Leads + Tab), SC-63", Power - Max=47W, Supplier Device Package=PG-TO252-3, Supplier Part Number 1=DMG3406L-13DI-ND, Category="Discrete Semiconductor Products", ComponentLink1Description=http://www.infineon.com/dgdl/Infineon-IPD075N03LG-DS-v02_01-en.pdf?folderId=5546d4694909da4801490a07012f053b&fileId=db3a30431936bc4b011951d824f83aeb, ComponentLink1URL=http://www.infineon.com/dgdl/Infineon-IPD075N03LG-DS-v02_01-en.pdf?folderId=5546d4694909da4801490a07012f053b&fileId=db3a30431936bc4b011951d824f83aeb, ComponentLink2Description=http://www.semicon.toshiba.co.jp/info/docget.jsp?type=datasheet&lang=en&pid=SSM3K329R, ComponentLink2URL=http://www.semicon.toshiba.co.jp/info/docget.jsp?type=datasheet&lang=en&pid=SSM3K329R, FET Feature="Logic Level Gate", FET Type="MOSFET N-Channel, Metal Oxide", Gate Charge (Qg) @ Vgs="18nC @ 10V", LatestRevisionDate=17-Jul-2002, LatestRevisionNote="Re-released for DXP Platform.", Mounting Type="Surface Mount", PackageDescription="TO, Flat Index; 3 In-Line, Axial Leads; Body Dia. 4.6mm; Lead Dia. 0.5 mm (max)", PackageReference=E3, PackageVersion=1995/1996, Packaging="Cut Tape (CT)", Published=8-Jun-2000, Publisher="Altium Limited", Rds On (Max) @ Id, Vgs="7.5 mOhm @ 30A, 10V", RoHS="RoHS Compliant", Supplier 1=Digi-Key, Vgs(th) (Max) @ Id="2.2V @ 250µA"
Q3 Q4 Q13: library part MOSFET-N, "N-Channel MOSFET", Current - Continuous Drain (Id) @ 25°C="50A (Tc)", Drain to Source Voltage (Vdss)=30V, Input Capacitance (Ciss) @ Vds="1900pF @ 15V", Manufacturer="Infineon Technologies", Manufacturer Part Number="IPD075N03L G", Package / Case="TO-252-3, DPak (2 Leads + Tab), SC-63", Power - Max=47W, Supplier Device Package=PG-TO252-3, Supplier Part Number 1=DMG3406L-13DICT-ND, Category="Discrete Semiconductor Products", ComponentLink1Description=http://www.infineon.com/dgdl/Infineon-IPD075N03LG-DS-v02_01-en.pdf?folderId=5546d4694909da4801490a07012f053b&fileId=db3a30431936bc4b011951d824f83aeb, ComponentLink1URL=http://www.infineon.com/dgdl/Infineon-IPD075N03LG-DS-v02_01-en.pdf?folderId=5546d4694909da4801490a07012f053b&fileId=db3a30431936bc4b011951d824f83aeb, ComponentLink2Description=http://www.semicon.toshiba.co.jp/info/docget.jsp?type=datasheet&lang=en&pid=SSM3K329R, ComponentLink2URL=http://www.semicon.toshiba.co.jp/info/docget.jsp?type=datasheet&lang=en&pid=SSM3K329R, FET Feature="Logic Level Gate", FET Type="MOSFET N-Channel, Metal Oxide", Gate Charge (Qg) @ Vgs="18nC @ 10V", LatestRevisionDate=17-Jul-2002, LatestRevisionNote="Re-released for DXP Platform.", Mounting Type="Surface Mount", PackageDescription="TO, Flat Index; 3 In-Line, Axial Leads; Body Dia. 4.6mm; Lead Dia. 0.5 mm (max)", PackageReference=E3, PackageVersion=1995/1996, Packaging="Cut Tape (CT)", Published=8-Jun-2000, Publisher="Altium Limited", Rds On (Max) @ Id, Vgs="7.5 mOhm @ 30A, 10V", RoHS="RoHS Compliant", Supplier 1=Digi-Key, Vgs(th) (Max) @ Id="2.2V @ 250µA"
Q7 Q8 Q9 Q10 Q11 Q12: library part MOSFET-N, "N-Channel MOSFET", Current - Continuous Drain (Id) @ 25°C="50A (Tc)", Drain to Source Voltage (Vdss)=30V, Input Capacitance (Ciss) @ Vds="1900pF @ 15V", Manufacturer="Infineon Technologies", Package / Case="TO-252-3, DPak (2 Leads + Tab), SC-63", Power - Max=47W, Supplier Device Package=PG-TO252-3, Supplier Part Number 1=DMG3406L-13DICT-ND, Category="Discrete Semiconductor Products", ComponentLink1Description=http://www.infineon.com/dgdl/Infineon-IPD075N03LG-DS-v02_01-en.pdf?folderId=5546d4694909da4801490a07012f053b&fileId=db3a30431936bc4b011951d824f83aeb, ComponentLink1URL=http://www.infineon.com/dgdl/Infineon-IPD075N03LG-DS-v02_01-en.pdf?folderId=5546d4694909da4801490a07012f053b&fileId=db3a30431936bc4b011951d824f83aeb, ComponentLink2Description=http://www.semicon.toshiba.co.jp/info/docget.jsp?type=datasheet&lang=en&pid=SSM3K329R, ComponentLink2URL=http://www.semicon.toshiba.co.jp/info/docget.jsp?type=datasheet&lang=en&pid=SSM3K329R, FET Feature="Logic Level Gate", FET Type="MOSFET N-Channel, Metal Oxide", Gate Charge (Qg) @ Vgs="18nC @ 10V", LatestRevisionDate=17-Jul-2002, LatestRevisionNote="Re-released for DXP Platform.", Mounting Type="Surface Mount", PackageDescription="TO, Flat Index; 3 In-Line, Axial Leads; Body Dia. 4.6mm; Lead Dia. 0.5 mm (max)", PackageReference=E3, PackageVersion=1995/1996, Packaging="Cut Tape (CT)", Published=8-Jun-2000, Publisher="Altium Limited", Rds On (Max) @ Id, Vgs="7.5 mOhm @ 30A, 10V", RoHS="RoHS Compliant", Supplier 1=Digi-Key, Vgs(th) (Max) @ Id="2.2V @ 250µA"
R1 R2 R3 R4 R5 R6 R7 R17: library part CMP-1591-00001-1, "0603 (1608 Metric) Chip Resistor", Case-EIA=0603, Case-Metric=1608, Supplier Part Number 1=P560BZCT-ND, PackageReference=RESC0603(1608), Supplier 1=Digi-Key
R8 R21 R23 R24: "RES SMD 10K OHM 5% 1/4W 0603", Manufacturer="Rohm Semiconductor", Manufacturer Part Number=ESR03EZPJ103, Operating Temperature="-55°C ~ 155°C", Package / Case="0603 (1608 Metric)", Power (Watts)="0.25W, 1/4W", Resistance (Ohms)=10k, Supplier Device Package=0603, Supplier Part Number 1=RHM10KDCT-ND, Temperature Coefficient=±200ppm/°C, Tolerance=±5%, Category=Resistors, ComponentLink1Description=http://rohmfs.rohm.com/en/products/databook/datasheet/passive/resistor/chip_resistor/esr.pdf, ComponentLink1URL=http://rohmfs.rohm.com/en/products/databook/datasheet/passive/resistor/chip_resistor/esr.pdf, Composition="Thick Film", Failure Rate=-, Features="Automotive AEC-Q200, Pulse Withstanding", Height - Seated (Max)="0.022\" (0.55mm)", LatestRevisionDate=17-Jul-2002, LatestRevisionNote="Re-released for DXP Platform.", PackageDescription="Axial Device, Thru-Hole; 2 Leads; 0.3 in Pin Spacing", PackageReference=AXIAL-0.3, Packaging="Cut Tape (CT)", Part Status=Active, Pricing 1="1=0.15, 10=0.119, 25=0.0824, 50=0.0642, 100=0.0458, 250=0.03568, 500=0.02836, 1000=0.02012 (CAD)", Published=8-Jun-2000, Publisher="Altium Limited", RoHS="RoHS Compliant", Size / Dimension="0.063\" L x 0.031\" W (1.60mm x 0.80mm)", Stock 1=0, Supplier 1=Digi-Key
R9 R10: library part CMP-1591-00001-1, "0603 (1608 Metric) Chip Resistor", Case-EIA=0603, Case-Metric=1608, Supplier Part Number 1=311-10KGRCT-ND, PackageReference=RESC0603(1608), Supplier 1=Digi-Key
R11: library part CMP-1012-00107-1, "24K 0.1W 5% 0603 (1608 Metric)  SMD", Case-EIA=0603, Case-Metric=1608, Power="0.1 W", Tolerance="5 %", Technology=SMT
R12: library part CMP-1012-00097-1, "9K1 0.1W 5% 0603 (1608 Metric)  SMD", Case-EIA=0603, Case-Metric=1608, Power="0.1 W", Tolerance="5 %", Technology=SMT
R13 R15 R31: library part Res1, "Resistor", Manufacturer="Panasonic Electronic Components", Manufacturer Part Number=ERJ-3EKF60R4V, Operating Temperature="-55°C ~ 155°C", Package / Case="0603 (1608 Metric)", Power (Watts)="0.1W, 1/10W", Resistance (Ohms)=60.4, Supplier Device Package=0603, Supplier Part Number 1=P60.4HCT-ND, Temperature Coefficient=±100ppm/°C, Tolerance=±1%, Category=Resistors, ComponentLink1Description=http://industrial.panasonic.com/www-cgi/jvcr13pz.cgi?E+PZ+3+AOA0002+ERJ3EKF60R4V+7+WW, ComponentLink1URL=http://industrial.panasonic.com/www-cgi/jvcr13pz.cgi?E+PZ+3+AOA0002+ERJ3EKF60R4V+7+WW, Composition="Thick Film", Features="Automotive AEC-Q200", Height="0.022\" (0.55mm)", LatestRevisionDate=17-Jul-2002, LatestRevisionNote="Re-released for DXP Platform.", Number of Terminations=2, PackageDescription="Axial Device, Thru-Hole; 2 Leads; 0.3 in Pin Spacing", PackageReference=AXIAL-0.3, Packaging="Cut Tape (CT)", Pricing 1="1=0.15, 50=0.0176, 100=0.0129, 250=0.00992, 500=0.0079, 1000=0.00583 (CAD)", Published=8-Jun-2000, Publisher="Altium Limited", RoHS="RoHS Compliant", Size / Dimension="0.063\" L x 0.031\" W (1.60mm x 0.80mm)", Stock 1=113077, Supplier 1=Digi-Key
R14 R16: library part Res1, "Resistor", Manufacturer="Rohm Semiconductor", Manufacturer Part Number=ESR03EZPJ103, Operating Temperature="-55°C ~ 155°C", Package / Case="0603 (1608 Metric)", Power (Watts)="0.25W, 1/4W", Resistance (Ohms)=10k, Supplier Part Number 1=RHM10KDCT-ND, Temperature Coefficient=±200ppm/°C, Tolerance=±5%, Category=Resistors, ComponentLink1Description=http://rohmfs.rohm.com/en/products/databook/datasheet/passive/resistor/chip_resistor/esr.pdf, ComponentLink1URL=http://rohmfs.rohm.com/en/products/databook/datasheet/passive/resistor/chip_resistor/esr.pdf, Composition="Thick Film", Features="Automotive AEC-Q200, Pulse Withstanding", Height="0.022\" (0.55mm)", LatestRevisionDate=17-Jul-2002, LatestRevisionNote="Re-released for DXP Platform.", Number of Terminations=2, PackageDescription="Axial Device, Thru-Hole; 2 Leads; 0.3 in Pin Spacing", PackageReference=AXIAL-0.3, Packaging="Cut Tape (CT)", Pricing 1="1=0.15, 10=0.121, 25=0.0836, 100=0.0466, 250=0.03628, 500=0.02884, 1000=0.02046 (CAD)", Published=8-Jun-2000, Publisher="Altium Limited", RoHS="RoHS Compliant", Size / Dimension="0.063\" L x 0.031\" W (1.60mm x 0.80mm)", Stock 1=8360, Supplier 1=Digi-Key, Supplier Device Package="0603 (1608 Metric)"
R18: "Resistor", Manufacturer=Yageo, Manufacturer Part Number=RC0603JR-07180RL, Operating Temperature="-55°C ~ 155°C", Package / Case="0603 (1608 Metric)", Power (Watts)="0.1W, 1/10W", Resistance (Ohms)=180, Supplier Device Package=0603, Supplier Part Number 1=311-180GRCT-ND, Temperature Coefficient=±100ppm/°C, Tolerance=±5%, Category=Resistors, ComponentLink1Description=http://www.yageo.com/NewPortal/yageodocoutput?fileName=/pdf/R-Chip/PYu-RC_Group_51_RoHS_L_4.pdf, ComponentLink1URL=http://www.yageo.com/NewPortal/yageodocoutput?fileName=/pdf/R-Chip/PYu-RC_Group_51_RoHS_L_4.pdf, Composition="Thick Film", Failure Rate=-, Features="Moisture Resistant", Height - Seated (Max)="0.022\" (0.55mm)", Number of Terminations=2, Packaging="Cut Tape (CT)", Part Status=Active, Pricing 1="1=0.16, 10=0.016, 25=0.0112, 50=0.0084, 100=0.0062, 250=0.0048, 500=0.00382, 1000=0.00281 (CAD)", RoHS="RoHS Compliant", Size / Dimension="0.063\" L x 0.031\" W (1.60mm x 0.80mm)", Stock 1=201936, Supplier 1=Digi-Key
R20: "Resistor", Manufacturer=Yageo, Manufacturer Part Number=RC0603JR-0782RL, Operating Temperature="-55°C ~ 155°C", Package / Case="0603 (1608 Metric)", Power (Watts)="0.1W, 1/10W", Resistance (Ohms)=82, Supplier Device Package=0603, Supplier Part Number 1=311-82GRCT-ND, Temperature Coefficient=±100ppm/°C, Tolerance=±5%, Category=Resistors, ComponentLink1Description=http://www.yageo.com/NewPortal/yageodocoutput?fileName=/pdf/R-Chip/PYu-RC_Group_51_RoHS_L_4.pdf, ComponentLink1URL=http://www.yageo.com/NewPortal/yageodocoutput?fileName=/pdf/R-Chip/PYu-RC_Group_51_RoHS_L_4.pdf, Composition="Thick Film", Failure Rate=-, Features="Moisture Resistant", Height - Seated (Max)="0.022\" (0.55mm)", Number of Terminations=2, Packaging="Cut Tape (CT)", Part Status=Active, Pricing 1="1=0.16, 10=0.016, 25=0.0112, 50=0.0084, 100=0.0062, 250=0.0048, 500=0.00382, 1000=0.00281 (CAD)", RoHS="RoHS Compliant", Size / Dimension="0.063\" L x 0.031\" W (1.60mm x 0.80mm)", Stock 1=72049, Supplier 1=Digi-Key